# Altium PCB PCB1.PcbDoc (part 2 of 3)
Units mm, origin at the board's own origin, x right, y up, seen from the top; angles counter-clockwise.
Board outline 145 x 122 mm, 4 copper layers (Top Layer, Middle Layer 1, Middle Layer 2, Bottom Layer), stack 1.466 mm thick; 149 components, 242 nets, 995 pads, 740 vias.
Unrouted connection lines stored in the file: 53.
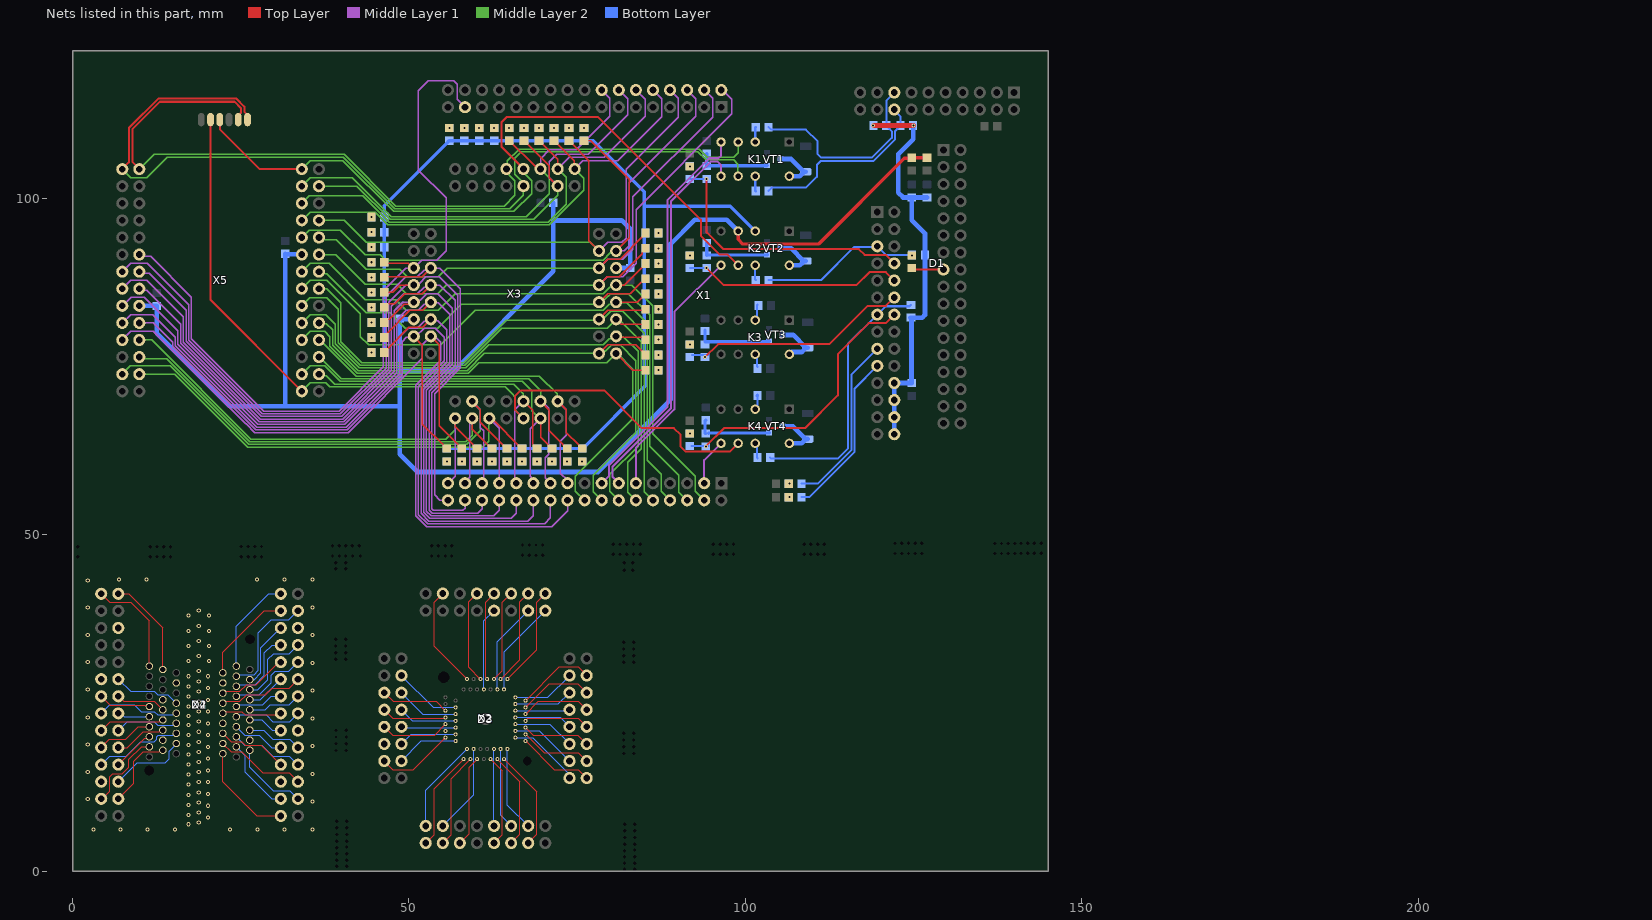
[diagram p4: the nets of this part, all layers, seen from the top]

## Via types
v1: diameter 0.6, hole 0.3, Top Layer to Bottom Layer, tented both sides, 740 vias

## Nets (pads, with @x,y where several pads share a name; then routed paths per layer and width w, separated by ;. In a path a pad name is that pad's centre, name@x,y a point inside that pad or via, vN(x,y) a via of type N, cw(c..) or ccw(c..) an arc to the next point about the centre after c; other vN are vias at no path point) (continued)
IO0_7: IO0_7.2 X1.16 X3.5 X5.12 | length 116
  Top Layer w0.2: IO0_7.2@46.325,90.542 46.492,90.375 49.869,90.375 50.559,89.685 X3.5@50.71,89.685
  Middle Layer 1 w0.2: X5.12@9.92,91.685 10.19,91.415 11.585,91.415 17.659,85.341 17.659,79.144 28.378,68.425 39.65,68.425 46.2,74.975 46.2,86.325 49.536,89.661 50.686,89.661 X3.5@50.71,89.685 51.9,90.875 54.125,90.875 55.525,92.275 55.525,100.1 51.4,104.225 51.4,116.002 52.898,117.5 56.625,117.5 57.16,116.965 57.16,114.765 X1.16@58.33,113.595
IO0_7_KY: D2.12 X4.12 | length 10.1
  Bottom Layer w0.1: X4.12@6.795,28.56 8.605,26.75 12.125,26.75 12.625,26.25 14.16,26.25 D2.12@15.41,25
IO0_7_KY2: D3.5 X2.5 | length 10.2
  Top Layer w0.1: X2.5@46.335,26.56 47.645,25.25 54.045,25.25 D3.5@55.42,23.875
IO1_0: IO1_0.2 X1.33 X3.6 X5.13 | length 122.2
  Top Layer w0.2: IO1_0.2@46.249,87.875 46.249,88.375 51.94,88.375 X3.6@53.25,89.685
  Middle Layer 1 w0.2: X5.13@7.38,89.145 8.61,90.375 11.125,90.375 17.259,84.241 17.259,78.978 28.212,68.025 39.815,68.025 46.6,74.81 46.6,85.475 49.5,88.375 51.25,88.375 52.254,89.379 52.944,89.379 X3.6@53.25,89.685 54.565,89.685 57.65,86.6 57.65,74.862 53.8,71.012 53.8,55.95 54.595,55.155 X1.33@55.79,55.155
IO1_0_KY: D2.13 X4.13 | length 7.8
  Top Layer w0.1: X4.13@4.255,26.02 5.595,24.68 11.23,24.68 D2.13@11.41,24.5
IO1_0_KY2: D3.6 X2.6 | length 9.4
  Bottom Layer w0.1: X2.6@48.875,26.56 52.06,23.375 D3.6@56.945,23.375
IO1_1: IO1_1.2 X1.34 X3.7 X5.14 | length 119.7
  Top Layer w0.2: IO1_1.2@46.176,85.569 46.176,86.069 47.575,86.069 48.651,87.145 X3.7@50.71,87.145
  Middle Layer 1 w0.2: X5.14@9.92,89.145 10.17,88.895 11.355,88.895 16.859,83.391 16.859,78.812 28.047,67.625 39.981,67.625 47,74.644 47,84.625 49.52,87.145 X3.7@50.71,87.145 51.016,87.451 51.576,87.451 52.5,88.375 54.5,88.375 57.25,85.625 57.25,75.027 53.4,71.177 53.4,53.869 53.619,53.65 58,53.65 58.33,53.98 X1.34@58.33,55.155
IO1_1_KY: D2.14 X4.14 | length 7.5
  Top Layer w0.1: X4.14@6.795,26.02 7.565,25.25 12.16,25.25 D2.14@13.41,24
IO1_1_KY2: D3.7 X2.7 | length 9.7
  Top Layer w0.1: X2.7@46.335,24.02 47.605,22.75 55.111,22.75 55.141,22.779 55.324,22.779 D3.7@55.42,22.875
IO1_2: IO1_2.2 X1.35 X3.8 X5.15 | length 126.2
  Top Layer w0.2: IO1_2.2@46.325,83.883 46.825,84.383 47.883,84.383 49.375,85.875 51.98,85.875 X3.8@53.25,87.145
  Middle Layer 1 w0.2: X5.15@7.38,86.605 8.65,87.875 11,87.875 16.459,82.416 16.459,78.647 27.881,67.225 40.147,67.225 47.4,74.478 47.4,84.033 49.242,85.875 51.25,85.875 52.236,86.861 52.966,86.861 X3.8@53.25,87.145 54.605,87.145 56.85,84.9 56.85,75.193 53,71.343 53,53.703 53.453,53.25 60.25,53.25 60.87,53.87 X1.35@60.87,55.155
IO1_2_KY: D2.15 X4.15 | length 12.4
  Bottom Layer w0.1: X4.15@4.255,23.48 5.525,24.75 9.195,24.75 10.195,23.75 12.125,23.75 12.625,23.25 14.889,23.25 15.139,23.5 D2.15@15.41,23.5
IO1_2_KY2: D3.8 X2.8 | length 8.8
  Bottom Layer w0.1: X2.8@48.875,24.02 50.52,22.375 D3.8@56.945,22.375
IO1_3: IO1_3.2 X1.36 X3.9 X5.16 | length 121.4
  Top Layer w0.2: IO1_3.2@46.155,81.097 46.155,81.597 46.656,82.098 47.098,82.098 49.321,84.321 50.426,84.321 X3.9@50.71,84.605
  Middle Layer 1 w0.2: X5.16@9.92,86.605 10.144,86.381 10.994,86.381 16.059,81.316 16.059,78.481 27.715,66.825 40.312,66.825 47.8,74.313 47.8,83.3 49.105,84.605 X3.9@50.71,84.605 51.016,84.911 51.661,84.911 52.625,85.875 54.25,85.875 56.45,83.675 56.45,75.359 52.6,71.509 52.6,53.538 53.288,52.85 62.6,52.85 63.41,53.66 X1.36@63.41,55.155
IO1_3_KY: D2.16 X4.16 | length 4.8
  Bottom Layer w0.1: X4.16@6.795,23.48 7.224,23.48 7.704,23 D2.16@11.41,23
IO1_3_KY2: D3.9 X2.9 | length 10.3
  Top Layer w0.1: X2.9@46.335,21.48 47.565,20.25 53.795,20.25 D3.9@55.42,21.875
IO1_4: IO1_4.2 X1.37 X3.10 X5.17 | length 128.3
  Top Layer w0.2: IO1_4.2@46.144,78.861 IO1_4.2@46.144,79.361 ; IO1_4.2@46.325,79.361 46.825,79.861 46.825,80.075 50.125,83.375 52.02,83.375 X3.10@53.25,84.605
  Middle Layer 1 w0.2: X5.17@7.38,84.065 8.69,85.375 10.625,85.375 15.659,80.341 15.659,78.315 27.55,66.425 40.478,66.425 48.2,74.147 48.2,81.95 49.625,83.375 51.375,83.375 52.299,84.299 52.944,84.299 X3.10@53.25,84.605 53.313,84.542 54.333,84.542 56.05,82.825 56.05,75.524 52.2,71.674 52.2,53.372 53.122,52.45 65.2,52.45 65.95,53.2 X1.37@65.95,55.155
IO1_4_KY: D2.17 X4.17 | length 9.8
  Top Layer w0.1: X4.17@4.255,20.94 5.565,22.25 12.889,22.25 13.139,22.5 D2.17@13.41,22.5
IO1_4_KY2: D3.10 X2.10 | length 8.1
  Bottom Layer w0.1: X2.10@48.875,21.48 48.98,21.375 D3.10@56.945,21.375
IO1_5: IO1_5.2 X1.38 X3.12 X5.19 | length 125.3
  Top Layer w0.2: IO1_5.2@46.134,76.575 46.134,77.125 46.275,77.125 46.825,77.675 46.825,77.7 50,80.875 52.06,80.875 X3.12@53.25,82.065
  Middle Layer 1 w0.2: X5.19@7.38,81.525 8.605,82.75 11.875,82.75 15.259,79.366 15.259,78.15 27.384,66.025 40.644,66.025 48.6,73.981 48.6,79.475 49.875,80.75 51.25,80.75 52.259,81.759 52.944,81.759 X3.12@53.25,82.065 53.494,81.821 54.304,81.821 55.65,80.475 55.65,75.69 51.8,71.84 51.8,53.206 52.956,52.05 67.675,52.05 68.49,52.865 X1.38@68.49,55.155
IO1_5_KY: D2.19 X4.19 | length 8.4
  Top Layer w0.1: X4.19@4.255,18.4 5.48,19.625 7.875,19.625 9.75,21.5 D2.19@11.41,21.5
IO1_5_KY2: D3.12 X2.12 | length 8.7
  Bottom Layer w0.1: X2.12@48.875,18.94 50.31,20.375 D3.12@56.945,20.375
IO1_6: IO1_6.2 X1.39 X3.13 X5.20 | length 131.9
  Top Layer w0.2: X3.13@50.71,79.525 52,78.235 52,66.472 55.075,63.397 55.075,63.347 55.575,62.847 IO1_6.2@55.625,62.847
  Middle Layer 1 w0.2: X5.20@9.92,81.525 11.975,81.525 14.859,78.641 14.859,77.984 27.218,65.625 40.809,65.625 49,73.816 49,78.75 49.627,79.377 50.562,79.377 X3.13@50.71,79.525 51.025,79.525 52.25,80.75 53.875,80.75 55.25,79.375 55.25,75.875 51.4,72.025 51.4,53.041 52.791,51.65 70.15,51.65 71.03,52.53 X1.39@71.03,55.155
IO1_6_KY: D2.20 X4.20 | length 7.7
  Top Layer w0.1: X4.20@6.795,18.4 8.15,18.4 10.5,20.75 12.889,20.75 13.139,21 D2.20@13.41,21
IO1_6_KY2: D3.13 X2.13 | length 11.6
  Top Layer w0.1: X2.13@46.335,16.4 47.61,15.125 50.67,15.125 D3.13@55.42,19.875
IO1_7: IO1_7.2 X1.40 X3.14 X5.21 | length 133.3
  Top Layer w0.2: X3.14@53.25,79.525 54.5,78.275 54.5,66.208 57.311,63.397 57.311,63.347 57.811,62.847 IO1_7.2@57.861,62.847
  Middle Layer 1 w0.2: X5.21@7.38,78.985 8.645,80.25 12,80.25 25.75,66.5 25.777,66.5 27.052,65.225 40.975,65.225 52,76.25 52,78.275 X3.14@53.25,79.525 53.556,79.219 54.156,79.219 54.75,78.625 54.75,76 51,72.25 51,52.875 52.625,51.25 71.25,51.25 73.57,53.57 X1.40@73.57,55.155
IO1_7_KY: D2.21 X4.21 | length 13.3
  Bottom Layer w0.1: X4.21@4.255,15.86 5.52,17.125 8,17.125 10.125,19.25 12.125,19.25 12.5,19.625 12.5,20 12.75,20.25 14.889,20.25 15.139,20.5 D2.21@15.41,20.5
IO1_7_KY2: D3.14 X2.14 | length 9.3
  Bottom Layer w0.1: X2.14@48.875,16.4 51.85,19.375 D3.14@56.945,19.375
IO2_0: IO2_0.2 X1.49 X3.15 X5.22 | length 71.3
  Top Layer w0.2: X3.15@56.86,67.335 56.86,66.084 59.547,63.397 59.547,63.347 60.047,62.847 IO2_0.2@60.097,62.847
  Middle Layer 1 w0.2: X1.49@55.79,57.695 56.86,58.765 X3.15@56.86,67.335
  Middle Layer 2 w0.2: X5.22@9.92,78.985 11.765,78.985 26.5,64.25 55.5,64.25 56.86,65.61 X3.15@56.86,67.335
IO2_0_KY: D2.22 X4.22 | length 6.3
  Top Layer w0.1: X4.22@6.795,15.86 10.744,19.809 11.219,19.809 D2.22@11.41,20
IO2_0_KY2: D3.15 X2.15 | length 14.8
  Top Layer w0.1: X2.15@52.485,4.21 53.75,5.475 53.75,12.295 D3.15@58.125,16.67
IO2_1: IO2_1.2 X1.50 X3.17 X5.24 | length 73.4
  Top Layer w0.2: X3.17@59.4,67.335 59.4,65.73 62.283,62.847 IO2_1.2@62.333,62.847
  Middle Layer 1 w0.2: X1.50@58.33,57.695 58.33,57.886 59,58.556 59,66.502 59.4,66.902 X3.17@59.4,67.335
  Middle Layer 2 w0.2: X5.24@9.92,76.445 10.195,76.17 14.014,76.17 26.334,63.85 58.409,63.85 59.4,64.841 X3.17@59.4,67.335
IO2_1_KY: D2.24 X4.24 | length 11.7
  Bottom Layer w0.1: X4.24@6.795,13.32 9.6,16.125 13.75,16.125 14.375,16.75 14.375,17.875 14.7,18.2 15.41,18.91 D2.24@15.41,19
IO2_1_KY2: D3.17 X2.17 | length 14.2
  Top Layer w0.1: X2.17@55.025,4.21 56.25,5.435 56.25,13.795 D3.17@59.125,16.67
IO2_2: IO2_2.2 X1.51 X3.18 X5.25 | length 86.5
  Top Layer w0.2: X3.18@59.4,69.875 60.625,68.65 60.625,66.741 64.519,62.847 IO2_2.2@64.569,62.847
  Middle Layer 1 w0.2: X3.18@59.4,69.875 60.625,68.65 60.625,65.972 61.125,65.472 61.125,57.95 X1.51@60.87,57.695
  Middle Layer 2 w0.2: X5.25@7.38,73.905 8.6,75.125 14.494,75.125 26.169,63.45 58.575,63.45 60.625,65.5 60.625,68.65 X3.18@59.4,69.875
IO2_2_KY: D2.25 X4.25 | length 12.3
  Top Layer w0.1: X4.25@4.255,10.78 4.405,10.78 5.525,11.9 5.525,14.025 6,14.5 7.375,14.5 8.375,15.5 8.375,16.625 10.25,18.5 D2.25@11.41,18.5
IO2_2_KY2: D3.18 X2.18 | length 13.4
  Bottom Layer w0.1: X2.18@55.025,6.75 59.625,11.35 D3.18@59.625,18.195
IO2_3: IO2_3.2 X1.52 X3.19 X5.26 | length 77.2
  Top Layer w0.2: X3.19@61.94,67.335 62.267,67.335 66.756,62.847 IO2_3.2@66.806,62.847
  Middle Layer 1 w0.2: X3.19@61.94,67.335 63.41,65.865 X1.52@63.41,57.695
  Middle Layer 2 w0.2: X5.26@9.92,73.905 15.148,73.905 26.003,63.05 60.919,63.05 61.826,63.958 61.826,67.221 X3.19@61.94,67.335
IO2_3_KY: D2.26 X4.26 | length 11.5
  Top Layer w0.1: X4.26@6.795,10.78 9.12,13.105 9.12,16.37 10.5,17.75 12.889,17.75 13.139,18 D2.26@13.41,18
IO2_3_KY2: D3.19 X2.19 | length 13.5
  Top Layer w0.1: X2.19@57.565,4.21 58.96,5.605 58.96,15.505 D3.19@60.125,16.67
IO2_4: IO2_4.2 X1.53 X3.24 X5.31 | length 53.4
  Top Layer w0.2: X3.24@67.02,69.875 68.375,68.52 68.375,63.464 68.492,63.347 68.992,62.847 IO2_4.2@69.042,62.847
  Middle Layer 1 w0.2: X1.53@65.95,57.695 65.75,57.895 65.75,68.605 X3.24@67.02,69.875
  Middle Layer 2 w0.2: X5.31@36.62,73.905 36.844,73.681 37.694,73.681 38.95,72.425 65.575,72.425 67.02,70.98 X3.24@67.02,69.875
IO2_4_KY: D2.31 X4.31 | length 11.6
  Bottom Layer w0.1: D2.31@26.34,18 26.34,15.493 29.855,11.978 32.297,11.978 X4.31@33.495,10.78
IO2_4_KY2: D3.24 X2.24 | length 11.5
  Bottom Layer w0.1: D3.24@62.625,18.195 62.625,6.77 X2.24@62.645,6.75
IO2_5: IO2_5.2 X1.54 X3.25 X5.32 | length 56.6
  Top Layer w0.2: X3.25@69.56,67.335 69.56,64.564 70.728,63.397 70.728,63.347 71.228,62.847 IO2_5.2@71.278,62.847
  Middle Layer 1 w0.2: X1.54@68.49,57.695 68.184,58.001 68.184,58.553 68,58.737 68,65.775 X3.25@69.56,67.335
  Middle Layer 2 w0.2: X5.32@34.08,73.905 35.3,75.125 37.5,75.125 39.8,72.825 66.859,72.825 68.25,71.434 68.25,68.5 69.415,67.335 X3.25@69.56,67.335
IO2_5_KY: D2.32 X4.32 | length 11.3
  Bottom Layer w0.1: D2.32@24.34,18.5 25.625,17.215 25.625,14.75 29.595,10.78 X4.32@30.955,10.78
IO2_5_KY2: D3.25 X2.25 | length 14.4
  Top Layer w0.1: D3.25@63.125,16.67 66.5,13.295 66.5,5.525 X2.25@65.185,4.21
IO2_6: IO2_6.2 X1.55 X3.26 X5.33 | length 58.6
  Top Layer w0.2: X3.26@69.56,69.875 70.875,68.56 70.875,65.485 72.964,63.397 72.964,63.347 73.464,62.847 IO2_6.2@73.514,62.847
  Middle Layer 1 w0.2: X3.26@69.56,69.875 69.75,69.875 70.75,68.875 70.75,62 70.25,61.5 70.25,58.475 X1.55@71.03,57.695
  Middle Layer 2 w0.2: X5.33@36.62,76.445 36.746,76.445 39.966,73.225 67.775,73.225 69.56,71.44 X3.26@69.56,69.875
IO2_6_KY: D2.33 X4.33 | length 13.5
  Top Layer w0.1: D2.33@22.34,19 23.59,17.75 25.125,17.75 28.25,14.625 32.19,14.625 X4.33@33.495,13.32
IO2_6_KY2: D3.26 X2.26 | length 12.2
  Bottom Layer w0.1: D3.26@63.625,18.337 63.625,8.31 X2.26@65.185,6.75
IO2_7: IO2_7.2 X1.56 X3.28 X5.35 | length 61.9
  Top Layer w0.2: X3.28@72.1,69.875 73.375,68.6 73.375,65.222 75.2,63.397 75.2,63.347 75.7,62.847 IO2_7.2@75.75,62.847
  Middle Layer 1 w0.2: X3.28@72.1,69.875 73.375,68.6 73.375,64.809 72.5,63.934 72.5,59.198 73.57,58.128 X1.56@73.57,57.695
  Middle Layer 2 w0.2: X5.35@36.62,78.985 36.765,78.985 42.125,73.625 69.375,73.625 72.042,70.958 72.042,69.933 X3.28@72.1,69.875
IO2_7_KY: D2.35 X4.35 | length 10.9
  Bottom Layer w0.1: D2.35@24.34,20 25.59,18.75 28.125,18.75 29.75,17.125 32.23,17.125 X4.35@33.495,15.86
IO2_7_KY2: D3.28 X2.28 | length 12.7
  Bottom Layer w0.1: D3.28@64.625,18.195 64.625,9.85 X2.28@67.725,6.75
IO3_0: IO3_0.2 X1.41 X3.29 X5.36 | length 84.6
  Top Layer w0.2: X3.29@80.79,76.985 83.275,74.5 IO3_0.2@85.416,74.5
  Middle Layer 2 w0.2: X5.36@34.08,78.985 35.345,80.25 37.5,80.25 38.25,79.5 38.25,78.066 42.291,74.025 58.8,74.025 60.4,75.625 79.43,75.625 X3.29@80.79,76.985 80.956,76.985 83.3,74.641 83.3,67.3 74.75,58.75 74.75,56.515 X1.41@76.11,55.155
IO3_0_KY: D2.36 X4.36 | length 10.5
  Top Layer w0.1: D2.36@22.34,20.5 23.59,19.25 25.125,19.25 25.625,18.75 28.065,18.75 X4.36@30.955,15.86
IO3_0_KY2: D3.29 X2.29 | length 11.4
  Top Layer w0.1: D3.29@67.33,19.375 71.58,15.125 75.15,15.125 X2.29@76.415,13.86
IO3_1: IO3_1.2 X1.42 X3.30 X5.37 | length 85.9
  Top Layer w0.2: X3.30@78.25,76.985 79.515,78.25 83.739,78.25 85.175,76.814 IO3_1.2@85.175,76.764
  Middle Layer 2 w0.2: X5.37@36.62,81.525 36.723,81.422 37.703,81.422 38.65,80.475 38.65,78.231 42.456,74.425 58.634,74.425 61.194,76.985 X3.30@78.25,76.985 78.556,77.291 79.166,77.291 80.125,78.25 81.375,78.25 83.7,75.925 83.7,65.2 77.375,58.875 77.375,56.43 X1.42@78.65,55.155
IO3_1_KY: D2.37 X4.37 | length 8.2
  Bottom Layer w0.1: D2.37@26.34,21 28.375,21 29.75,19.625 32.27,19.625 X4.37@33.495,18.4
IO3_1_KY2: D3.30 X2.30 | length 10.9
  Bottom Layer w0.1: D3.30@65.805,19.875 68.375,19.875 73.49,14.76 73.49,14.705 73.875,14.32 X2.30@73.875,13.86
IO3_2: IO3_2.2 X1.43 X3.31 X5.38 | length 87.4
  Top Layer w0.2: X3.31@80.79,79.525 80.94,79.375 84.828,79.375 IO3_2.2@85.175,79.028
  Middle Layer 2 w0.2: X5.38@34.08,81.525 35.305,82.75 37.625,82.75 39.05,81.325 39.05,78.397 42.622,74.825 58.468,74.825 61.893,78.25 78.875,78.25 79.759,79.134 79.966,79.134 80.357,79.525 80.38,79.502 81.873,79.502 84.1,77.275 84.1,63.225 79.875,59 79.875,56.47 X1.43@81.19,55.155
IO3_2_KY: D2.38 X4.38 | length 7.9
  Bottom Layer w0.1: D2.38@24.34,21.5 25.59,20.25 27.75,20.25 29.6,18.4 X4.38@30.955,18.4
IO3_2_KY2: D3.31 X2.31 | length 10.7
  Top Layer w0.1: D3.31@67.33,20.375 70.08,17.625 75.19,17.625 X2.31@76.415,16.4
IO3_3: IO3_3.2 X1.44 X3.33 X5.40 | length 91.8
  Top Layer w0.2: X3.33@80.79,82.065 81.563,81.292 IO3_3.2@85.175,81.292
  Middle Layer 2 w0.2: X5.40@34.08,84.065 35.265,85.25 37.75,85.25 39.45,83.55 39.45,78.563 42.788,75.225 58.303,75.225 63.828,80.75 79.475,80.75 X3.33@80.79,82.065 81.185,82.065 84.5,78.75 84.5,62.829 82.5,60.829 82.5,56.385 X1.44@83.73,55.155
IO3_3_KY: D2.40 X4.40 | length 5.3
  Bottom Layer w0.1: D2.40@26.34,22.5 28.125,22.5 29.685,20.94 X4.40@30.955,20.94
IO3_3_KY2: D3.33 X2.33 | length 10.1
  Top Layer w0.1: D3.33@67.33,21.375 68.455,20.25 75.105,20.25 X2.33@76.415,18.94
IO3_4: IO3_4.2 X1.45 X3.34 X5.41 | length 94
  Top Layer w0.2: X3.34@78.25,82.065 79.56,83.375 84.994,83.375 IO3_4.2@85.393,83.773
  Middle Layer 2 w0.2: X5.41@36.62,86.605 37.77,86.605 39.85,84.525 39.85,78.728 42.953,75.625 58.137,75.625 64.429,81.917 78.102,81.917 78.556,82.371 79.121,82.371 80,83.25 81.75,83.25 85,80 85,56.425 X1.45@86.27,55.155
IO3_4_KY: D2.41 X4.41 | length 10.2
  Bottom Layer w0.1: D2.41@24.34,23 24.611,23 24.861,23.25 28.75,23.25 29.75,22.25 32.265,22.25 X4.41@33.495,23.48
IO3_4_KY2: D3.34 X2.34 | length 9.3
  Bottom Layer w0.1: D3.34@65.805,21.875 70.94,21.875 X2.34@73.875,18.94
IO3_5: IO3_5.2 X1.46 X3.35 X5.42 | length 94.9
  Top Layer w0.2: X3.35@80.79,84.605 83.961,84.605 84.625,85.269 84.675,85.269 85.175,85.769 IO3_5.2@85.175,86.369
  Middle Layer 2 w0.2: X5.42@34.08,86.605 35.35,87.875 37.75,87.875 42.75,82.875 42.75,79.5 44,78.25 54.75,78.25 59.875,83.375 78.875,83.375 79.799,84.299 80.484,84.299 X3.35@80.79,84.605 80.893,84.502 82.373,84.502 85.4,81.475 85.4,61.1 87.5,59 87.5,56.465 X1.46@88.81,55.155
IO3_5_KY: D2.42 X4.42 | length 9
  Top Layer w0.1: D2.42@22.34,23.5 22.611,23.5 22.861,23.75 25.125,23.75 25.625,23.25 30.725,23.25 X4.42@30.955,23.48
IO3_5_KY2: D3.35 X2.35 | length 9.8
  Top Layer w0.1: D3.35@67.308,22.375 67.683,22.75 75.145,22.75 X2.35@76.415,21.48
IO3_6: IO3_6.2 X1.47 X3.36 X5.43 | length 94.3
  Top Layer w0.2: X3.36@78.25,84.605 79.52,85.875 82.875,85.875 84.533,87.533 84.675,87.533 IO3_6.2@85.175,88.033
  Middle Layer 2 w0.2: X5.43@36.62,89.145 36.926,88.839 37.786,88.839 43.625,83 47.2,83 49.45,80.75 54.25,80.75 57.804,84.304 77.949,84.304 X3.36@78.25,84.605 78.683,84.605 79.091,85.014 79.139,85.014 80,85.875 82.625,85.875 85.8,82.7 85.8,63.2 90.125,58.875 90.125,56.38 X1.47@91.35,55.155
IO3_6_KY: D2.43 X4.43 | length 8
  Bottom Layer w0.1: D2.43@26.34,24 28.625,24 29.375,24.75 32.225,24.75 X4.43@33.495,26.02
IO3_6_KY2: D3.36 X2.36 | length 8.9
  Bottom Layer w0.1: D3.36@65.58,22.875 72.48,22.875 X2.36@73.875,21.48
IO3_7: IO3_7.2 X1.48 X3.37 X5.44 | length 96.1
  Top Layer w0.2: X3.37@80.79,87.145 82.02,87.145 84.672,89.797 84.675,89.797 IO3_7.2@85.175,90.297
  Middle Layer 2 w0.2: X5.44@34.08,89.145 35.31,90.375 38.125,90.375 43.5,85 48,85 49.625,83.375 54.375,83.375 56.875,85.875 78.875,85.875 79.839,86.839 80.484,86.839 X3.37@80.79,87.145 83.105,87.145 86.2,84.05 86.2,65.05 92.52,58.73 92.52,56.525 X1.48@93.89,55.155
IO3_7_KY: D2.44 X4.44 | length 7.2
  Bottom Layer w0.1: D2.44@24.34,24.5 24.611,24.5 24.861,24.75 28.25,24.75 29.52,26.02 X4.44@30.955,26.02
IO3_7_KY2: D3.37 X2.37 | length 10.4
  Top Layer w0.1: D3.37@67.33,23.375 69.205,25.25 75.185,25.25 X2.37@76.415,24.02
IO4_0: IO4_0.2 X1.17 X3.38 X5.45 | length 93.2
  Top Layer w0.2: X3.38@78.25,87.145 79.48,88.375 81.25,88.375 84.675,91.8 84.675,92.111 IO4_0.2@85.175,92.611
  Middle Layer 1 w0.2: X3.38@78.25,87.145 79.48,88.375 81.75,88.375 83.75,90.375 83.75,98.375 98,112.625 98,114.788 96.653,116.135 X1.17@96.43,116.135
  Middle Layer 2 w0.2: X5.45@36.62,91.685 36.633,91.672 39.078,91.672 43.5,87.25 48.25,87.25 49.625,85.875 54.25,85.875 55.52,87.145 X3.38@78.25,87.145
IO4_0_KY: D2.45 X4.45 | length 12.6
  Top Layer w0.1: D2.45@22.34,25 22.611,25 22.861,25.25 24.875,25.25 25.875,26.25 28.645,26.25 29.645,27.25 32.185,27.25 X4.45@33.495,28.56
IO4_0_KY2: D3.38 X2.38 | length 8.4
  Bottom Layer w0.1: D3.38@65.58,23.875 73.73,23.875 X2.38@73.875,24.02
IO4_1: IO4_1.2 X1.18 X3.40 X5.47 | length 88.9
  Top Layer w0.2: X3.40@78.25,89.685 79.565,91 81.375,91 84.675,94.3 84.675,94.375 IO4_1.2@85.175,94.875
  Middle Layer 1 w0.2: X3.40@78.25,89.685 79.565,91 81.75,91 83.25,92.5 83.25,100.25 95.125,112.125 95.125,114.9 X1.18@93.89,116.135
  Middle Layer 2 w0.2: X5.47@36.62,94.225 36.926,93.919 39.206,93.919 43.625,89.5 48.625,89.5 49.75,88.375 54.375,88.375 55.685,89.685 X3.40@78.25,89.685
IO4_1_KY: D2.47 X4.47 | length 11.9
  Bottom Layer w0.1: D2.47@24.34,26 24.611,26 24.861,26.25 27.75,26.25 29.5,28 29.5,29.125 30.125,29.75 32.145,29.75 X4.47@33.495,31.1
IO4_1_KY2: D3.40 X2.40 | length 8.8
  Bottom Layer w0.1: D3.40@65.808,24.875 72.19,24.875 X2.40@73.875,26.56
IO4_2: IO4_2.2 X1.19 X3.41 X5.48 | length 100.2
  Top Layer w0.2: IO4_2.2@76,108.6 77.025,108.6 82.75,102.875 82.75,94.185 X3.41@80.79,92.225
  Middle Layer 1 w0.2: X3.41@80.79,92.225 81.975,92.225 82.75,93 82.75,102.375 92.625,112.25 92.625,114.86 X1.19@91.35,116.135
  Middle Layer 2 w0.2: X5.48@34.08,94.225 35.18,95.325 39.8,95.325 43.5,91.625 45.75,91.625 46.5,90.875 78.875,90.875 79.919,91.919 80.484,91.919 X3.41@80.79,92.225
IO4_2_KY: D2.48 X4.48 | length 10.5
  Top Layer w0.1: D2.48@22.34,26.5 22.611,26.5 22.861,26.75 24.875,26.75 25.875,27.75 27.282,27.75 30.632,31.1 X4.48@30.955,31.1
IO4_2_KY2: D3.41 X2.41 | length 11.7
  Top Layer w0.1: D3.41@67.33,25.375 72.33,30.375 75.14,30.375 X2.41@76.415,29.1
IO4_3: IO4_3.2 X1.20 X3.42 X5.49 | length 92.3
  Top Layer w0.2: IO4_3.2@73.778,108.6 73.828,108.6 74.328,108.1 74.328,108.05 76.75,105.628 76.75,93.725 X3.42@78.25,92.225
  Middle Layer 1 w0.2: X3.42@78.25,92.225 79.525,93.5 81.641,93.5 82.275,94.134 82.275,104.4 90,112.125 90,114.945 X1.20@88.81,116.135
  Middle Layer 2 w0.2: X5.49@36.62,96.765 40.36,96.765 43.625,93.5 76.975,93.5 X3.42@78.25,92.225
IO4_3_KY: D2.49 X4.49 | length 11.7
  Bottom Layer w0.1: D2.49@26.34,27 27.5,27 29,28.5 29,31.5 29.875,32.375 32.23,32.375 X4.49@33.495,33.64
IO4_3_KY2: D3.42 X2.42 | length 9.5
  Bottom Layer w0.1: D3.42@65.685,25.875 70.65,25.875 X2.42@73.875,29.1
IO4_4: IO4_4.2 X1.21 X3.43 X5.50 | length 75.2
  Top Layer w0.2: IO4_4.2@71.556,108.6 71.606,108.6 72.106,108.1 72.106,108.05 74.541,105.615 74.541,104.514 X3.43@74.64,104.415
  Middle Layer 1 w0.2: X3.43@74.64,104.415 75.85,105.625 81,105.625 87.557,112.182 87.557,114.848 X1.21@86.27,116.135
  Middle Layer 2 w0.2: X5.50@34.08,96.765 35.315,98 44.975,98 46.875,96.1 70.85,96.1 76,101.25 76,103.055 X3.43@74.64,104.415
IO4_4_KY: D2.50 X4.50 | length 11.1
  Bottom Layer w0.1: D2.50@24.34,27.5 24.611,27.5 24.861,27.75 27.125,27.75 28.5,29.125 28.5,32.5 29.64,33.64 X4.50@30.955,33.64
IO4_4_KY2: D3.43 X2.43 | length 15
  Top Layer w0.1: D3.43@64.625,28.58 69,32.955 69,40.025 X2.43@70.265,41.29
IO4_5: IO4_5.2 X1.22 X3.45 X5.52 | length 74.3
  Top Layer w0.2: IO4_5.2@69.333,108.6 69.383,108.6 69.883,108.1 69.883,108.05 72.1,105.833 X3.45@72.1,104.415
  Middle Layer 1 w0.2: X3.45@72.1,104.415 73.81,106.125 79,106.125 85.125,112.25 85.125,114.74 X1.22@83.73,116.135
  Middle Layer 2 w0.2: X5.52@34.08,99.305 35.18,100.405 43.135,100.405 47.04,96.5 70.684,96.5 73.375,99.191 73.375,103.14 X3.45@72.1,104.415
IO4_5_KY: D2.52 X4.52 | length 10
  Bottom Layer w0.1: D2.52@26.34,28.5 27,28.5 28,29.5 28,33.225 X4.52@30.955,36.18
IO4_5_KY2: D3.45 X2.45 | length 14.4
  Top Layer w0.1: D3.45@63.625,28.58 66.5,31.455 66.5,40.065 X2.45@67.725,41.29
IO4_6: IO4_6.2 X1.23 X3.46 X5.53 | length 72.1
  Top Layer w0.2: IO4_6.2@67.111,108.6 67.161,108.6 70.875,104.886 70.875,103.1 X3.46@72.1,101.875
  Middle Layer 1 w0.2: X3.46@72.1,101.875 70.883,103.092 70.883,105.508 72,106.625 76.625,106.625 82.5,112.5 82.5,114.825 X1.23@81.19,116.135
  Middle Layer 2 w0.2: X5.53@36.62,101.845 42.261,101.845 47.206,96.9 68.525,96.9 72.1,100.475 X3.46@72.1,101.875
IO4_6_KY: D2.53 X4.53 | length 16.5
  Bottom Layer w0.1: D2.53@24.34,29 24.611,29 24.861,29.25 27,29.25 27.625,29.875 27.625,35.5 29.5,37.375 32.15,37.375 X4.53@33.495,38.72
IO4_6_KY2: D3.46 X2.46 | length 13.6
  Bottom Layer w0.1: D3.46@63.125,27.055 63.125,34.15 X2.46@67.725,38.75
IO4_7: IO4_7.2 X1.24 X3.47 X5.54 | length 70.6
  Top Layer w0.2: IO4_7.2@64.889,108.6 64.939,108.6 68.818,104.721 69.254,104.721 X3.47@69.56,104.415
  Middle Layer 1 w0.2: X3.47@69.56,104.415 69.56,105.935 70.875,107.25 74.875,107.25 79.875,112.25 79.875,114.91 X1.24@78.65,116.135
  Middle Layer 2 w0.2: X5.54@34.08,101.845 35.36,103.125 41.547,103.125 47.372,97.3 67.425,97.3 70.875,100.75 70.875,103.1 X3.47@69.56,104.415
IO4_7_KY: D2.54 X4.54 | length 14.2
  Top Layer w0.1: D2.54@22.34,29.5 22.34,32.59 28.47,38.72 X4.54@30.955,38.72
IO4_7_KY2: D3.47 X2.47 | length 13.8
  Top Layer w0.1: D3.47@62.625,28.58 63.875,29.83 63.875,39.98 X2.47@65.185,41.29
LED_READ: D1.17X3 R41.1 | length 26.1
  Bottom Layer w0.3: R41.1@108.32,57.625 110.75,57.625 115.75,62.625 115.75,73.815 D1.17X3@119.61,77.675
LED_WRITE: D1.19X3 R42.1 | length 24.9
  Bottom Layer w0.3: R42.1@108.32,55.625 109.5,55.625 116.25,62.375 116.25,71.775 D1.19X3@119.61,75.135
NetK1_3: K1.3 R1.1 | length 2.2
  Bottom Layer w0.381: K1.3@101.47,108.415 101.47,110.545 R1.1@101.55,110.625
NetK1_10: K1.10 R3.1 | length 2.2
  Bottom Layer w0.381: K1.10@101.47,103.335 101.47,101.205 R3.1@101.55,101.125
NetK1_12: K1.12 VD1.1 VT1.3 | length 7.3
  Bottom Layer w0.7: VT1.3@105.25,105.875 106.8,105.875 VD1.1@108.7,103.975 ; K1.12@106.55,103.335 108.09,103.335 108.5,103.745 108.5,103.775 VD1.1@108.7,103.975 ; VD1.1@108.7,103.975 VD1.1@109,103.975 VD1.1@108.7,103.975
NetK2_10: K2.10 R56.1 | length 2.2
  Bottom Layer w0.3: K2.10@101.47,90.085 101.47,87.955 R56.1@101.55,87.875
NetK2_12: K2.12 VD2.1 VT2.3 | length 7.3
  Bottom Layer w0.7: VT2.3@105.25,92.625 106.8,92.625 VD2.1@108.7,90.725 ; K2.12@106.55,90.085 108.09,90.085 108.5,90.495 108.5,90.525 VD2.1@108.7,90.725 ; VD2.1@108.7,90.725 VD2.1@109,90.725 VD2.1@108.7,90.725
NetK3_3: K3.3 R54.1 | length 2
  Bottom Layer w0.3: K3.3@101.763,82.273 101.763,84.153 R54.1@101.843,84.233
NetK3_10: K3.10 R58.1 | length 2.2
  Bottom Layer w0.3: K3.10@101.763,77.193 101.763,75.063 R58.1@101.843,74.983
NetK3_12: K3.12 VD39.1 VT3.3 | length 7.3
  Bottom Layer w0.7: VT3.3@105.543,79.733 107.093,79.733 VD39.1@108.993,77.833 ; K3.12@106.843,77.193 108.383,77.193 108.793,77.603 108.793,77.633 VD39.1@108.993,77.833 ; VD39.1@108.993,77.833 VD39.1@109.293,77.833 VD39.1@108.993,77.833
NetK4_3: K4.3 R55.1 | length 2
  Bottom Layer w0.3: K4.3@101.79,68.737 R55.1@101.79,70.617
  Bottom Layer w0.5: K4.3@101.75,68.697 K4.3@101.79,68.737 ; R55.1@101.76,70.71 R55.1@101.8,70.75
NetK4_10: K4.10 R59.1 | length 2.2
  Bottom Layer w0.3: K4.10@101.75,63.617 101.75,61.487 R59.1@101.83,61.407
NetK4_12: K4.12 VD40.1 VT4.3 | length 7.3
  Bottom Layer w0.7: VT4.3@105.53,66.157 107.08,66.157 VD40.1@108.98,64.257 ; K4.12@106.83,63.617 108.37,63.617 108.78,64.027 108.78,64.057 VD40.1@108.98,64.257 ; VD40.1@108.98,64.257 VD40.1@109.28,64.257 VD40.1@108.98,64.257
NetR5_2: R5.2 R7.1 VT1.1 | length 10.9
  Bottom Layer w0.5: R7.1@94.25,106.675 R5.2@94.25,104.825 94.3,104.875 103.2,104.875 VT1.1@103.25,104.925
NetR6_2: R6.2 R8.1 VT2.1 | length 10.9
  Bottom Layer w0.5: R8.1@94.25,93.425 R6.2@94.25,91.575 94.3,91.625 103.2,91.625 VT2.1@103.25,91.675
NetR9_2: IO1_0.1 R9.2
  other v1: 44.425,88.306
NetR10_2: IO2_0.1 R10.2
  other v1: 60.097,60.947
NetR11_2: IO3_0.1 R11.2
  other v1: 87.075,74.5
NetR12_2: IO4_0.1 R12.2
  other v1: 87.075,92.611
NetR13_2: IO1_1.1 R13.2
  other v1: 44.425,86.069
NetR14_2: IO2_1.1 R14.2
  other v1: 62.333,60.947
NetR15_2: IO3_1.1 R15.2
  other v1: 87.075,76.764
NetR16_2: IO4_1.1 R16.2
  other v1: 87.075,94.875
NetR17_2: IO1_2.1 R17.2
  other v1: 44.425,83.833
NetR18_2: IO2_2.1 R18.2
  other v1: 64.569,60.947
NetR19_2: IO3_2.1 R19.2
  other v1: 87.075,79.028
NetR20_2: IO4_2.1 R20.2
  other v1: 76,110.5
NetR21_2: IO1_3.1 R21.2
  other v1: 44.425,81.597
NetR22_2: IO2_3.1 R22.2
  other v1: 66.806,60.947
NetR23_2: IO3_3.1 R23.2
  other v1: 87.075,81.292
NetR24_2: IO4_3.1 R24.2
  other v1: 73.778,110.5
NetR25_2: IO1_4.1 R25.2
  other v1: 44.425,79.361
NetR26_2: IO2_4.1 R26.2
  other v1: 69.042,60.947
NetR27_2: IO3_4.1 R27.2
  other v1: 87.075,83.556
NetR28_2: IO4_4.1 R28.2
  other v1: 71.556,110.5
NetR29_2: IO1_5.1 R29.2
  other v1: 44.425,77.125
NetR30_2: IO2_5.1 R30.2
  other v1: 71.278,60.947
NetR31_2: IO3_5.1 R31.2
  other v1: 87.075,85.819
NetR32_2: IO4_5.1 R32.2
  other v1: 69.333,110.5
NetR33_2: IO2_6.1 R33.2
  other v1: 73.514,60.947
NetR34_2: IO4_6.1 R34.2
  other v1: 67.111,110.5
NetR35_2: IO1_6.1 R35.2
  other v1: 55.625,60.947
NetR36_2: IO3_6.1 R36.2
  other v1: 87.075,88.083
NetR37_2: IO2_7.1 R37.2
  other v1: 75.75,60.947
NetR38_2: IO4_7.1 R38.2
  other v1: 64.889,110.5
NetR39_2: IO1_7.1 R39.2
  other v1: 57.861,60.947
NetR40_2: IO3_7.1 R40.2
  other v1: 87.075,90.347
NetR41_2: R41.2 READ.1
  other v1: 106.57,57.625
NetR42_2: R42.2 WRITE.1
  other v1: 106.57,55.625
NetR43_2: R43.2 RELE1.1
  other v1: 91.75,104.795
NetR44_2: R44.2 RELE2.1
  other v1: 91.75,91.545
NetR60_2: R60.2 R62.1 VT3.1 | length 11.3
  Bottom Layer w0.5: R62.1@94,80.434 94,78.733 103.493,78.733 VT3.1@103.543,78.783
NetR61_2: R61.2 R63.1 VT4.1 | length 11.1
  Bottom Layer w0.5: R61.2@94.125,65.075 94,65.2 94,66.925 R63.1@94.125,67.05 ; R61.2@94.53,65.107 94.58,65.157 103.48,65.157 VT4.1@103.53,65.207
NetR65_2: R65.2 RELE3.1
  other v1: 91.75,78.317
NetR66_2: R66.2 RELE4.1
  other v1: 91.75,65.077
NetR75_2: IO0_0.1 R75.2
  other v1: 62.667,110.5
NetR76_2: IO0_1.1 R76.2
  other v1: 60.444,110.5
NetR77_2: IO0_2.1 R77.2
  other v1: 58.222,110.5
NetR78_2: IO0_3.1 R78.2
  other v1: 56,110.5
NetR79_2: IO0_4.1 R79.2
  other v1: 44.425,97.25
NetR80_2: IO0_5.1 R80.2
  other v1: 44.425,95.014
NetR81_2: IO0_6.1 R81.2
  other v1: 44.425,92.778
NetR82_2: IO0_7.1 R82.2
  other v1: 44.425,90.542
OE: K4.9 OE.1 X3.23 X5.30 | length 125.5
  Top Layer w0.3: OE.1@20.5,111.75 20.5,84.945 X5.30@34.08,71.365 ; X3.23@67.02,67.335 65.75,68.605 65.75,70.625 66.625,71.5 79,71.5 84.625,65.875 89.375,65.875 90.375,64.875 90.375,63.125 91.125,62.375 97.688,62.375 K4.9@98.93,63.617
  Middle Layer 2 w0.2: X5.30@34.08,71.365 35.34,72.625 37.625,72.625 38.225,72.025 64.304,72.025 65.329,71 65.75,70.579 65.75,68.605 X3.23@67.02,67.335
OE_F: K4.8 X1.64 | length 7
  Middle Layer 1 w0.3: X1.64@93.89,57.695 93.89,61.117 K4.8@96.39,63.617
OE_KY: D2.30 X4.30 | length 14.9
  Top Layer w0.1: D2.30@22.34,17.5 22.34,13.285 27.385,8.24 X4.30@30.955,8.24
OE_KY2: D3.23 X2.23 | length 13.7
  Top Layer w0.1: D3.23@62.125,16.67 63.875,14.92 63.875,5.44 X2.23@62.645,4.21
OE_MC: D1.13X3 R59.2 R64.1 | length 39.5
  Bottom Layer w0.3: R59.2@103.7,61.5 103.825,61.375 113.793,61.375 115.25,62.832 115.25,78.395 D1.13X3@119.61,82.755 120.855,84 124.425,84 R64.1@124.625,84.2
RELE1: D1.8X3 R5.1 R43.1 | length 40.2
  Top Layer w0.3: v1(94.25,102.925) 94.25,95 96.75,92.5 116.875,92.5 117.75,91.625 120.9,91.625 D1.8X3@122.15,90.375
  Bottom Layer w0.3: R43.1@91.75,102.925 v1(94.25,102.925)
RELE2: D1.10X3 R6.1 R44.1 | length 32.8
  Top Layer w0.3: v1(94.25,89.675) 96.8,87.125 116.5,87.125 118.46,89.085 120.9,89.085 D1.10X3@122.15,87.835
  Bottom Layer w0.3: R44.1@91.75,89.675 v1(94.25,89.675)
RELE3: D1.12X3 R60.1 R65.1 | length 34.5
  Top Layer w0.3: v1@93.902,76.327 95.95,78.375 112.5,78.375 118.17,84.045 120.9,84.045 D1.12X3@122.15,85.295
  Bottom Layer w0.3: R65.1@92.043,76.783 R60.1@94.543,76.783
  other v1: 94,76.425
RELE4: D1.14X3 R61.1 R66.1 | length 42.2
  Top Layer w0.3: v1(94.125,63.175) 96.857,65.907 108.907,65.907 113.75,70.75 113.75,76.895 118.34,81.485 120.88,81.485 D1.14X3@122.15,82.755
  Bottom Layer w0.3: R66.1@92.03,63.207 R61.1@94.53,63.207
RESET: K2.9 RESET.1 X3.49 X5.56 | length 113.5
  Top Layer w0.3: RESET.1@21.875,111.75 21.884,111.741 21.884,110.3 27.799,104.385 X5.56@34.08,104.385 ; X3.49@67.02,104.415 63.75,107.685 63.75,111.375 64.5,112.125 78.125,112.125 93.375,96.875 93.375,94.5 96.15,91.725 97.301,91.725 K2.9@98.93,90.096
  Middle Layer 2 w0.2: X5.56@34.08,104.385 35.32,105.625 40.178,105.625 47.703,98.1 65.6,98.1 68.25,100.75 68.25,102.625 67.326,103.549 67.326,104.109 X3.49@67.02,104.415
RESET_F: K2.8 X1.60 | length 37.6
  Middle Layer 1 w0.3: X1.60@83.73,57.695 83.73,62.941 89.45,68.661 89.45,83.156 K2.8@96.39,90.096
RESET_MC: D1.5X3 R49.1 R56.2 R57.1 | length 23.9
  Bottom Layer w0.3: R56.2@103.45,87.875 111.25,87.875 116.205,92.83 D1.5X3@119.565,92.83 ; D1.5X3@119.61,92.915 120.9,91.625 R57.1@124.8,91.625
  other v1: 124.75,91.575
RESET_PCA_KY: D2.56 X4.56 | length 14.6
  Bottom Layer w0.1: D2.56@24.34,30.5 24.34,36.465 29.135,41.26 X4.56@30.955,41.26
RESET_PCA_KY2: D3.49 X2.49 | length 13.3
  Top Layer w0.1: D3.49@61.625,28.58 61.625,28.634 61.375,28.884 61.375,40.02 X2.49@62.645,41.29
RST_IN: R49.2 X1.OUT3 | length 4.8
  Top Layer w0.3: R49.2@124.75,89.675 124.97,89.455 X1.OUT3@129.45,89.455
SCL_F: K1.5 X1.58 | length 58.9
  Middle Layer 1 w0.3: X1.58@78.65,57.695 79.75,58.795 79.75,60.375 88.45,69.075 88.45,99.825 94.625,106 96,106 96.39,106.39 K1.5@96.39,108.415
SCL_MC: D1.15X2 R1.2 R2.1 | length 30
  Bottom Layer w0.3: R1.2@103.45,110.625 103.825,110.25 109,110.25 110.75,108.5 110.75,106.61 111.235,106.125 118.859,106.125 121.775,109.041 121.775,110 R2.1@120.95,110.825 ; R2.1@120.95,110.875 120.95,114.575 D1.15X2@122.15,115.775
SCL_PCA: K1.4 SCL.1 X3.51 X5.2 | length 130.2
  Top Layer w0.3: X5.2@9.92,104.385 9.92,104.404 8.875,105.449 8.875,110.293 12.982,114.4 24.084,114.4 25.025,113.459 25.025,112.776 24.625,112.376 SCL.1@24.625,111.75
  Middle Layer 2 w0.2: X5.2@9.92,104.385 12.11,106.575 40.359,106.575 48.034,98.9 64.175,98.9 65.75,100.475 65.75,102.625 64.869,103.506 64.869,103.594 64.48,103.982 64.623,104.125 64.623,105.623 66.375,107.375 93.125,107.375 94.35,106.15 98.275,106.15 98.93,106.805 K1.4@98.93,108.415
SCL_PCA_KY: D2.2 X4.2 | length 14.9
  Top Layer w0.1: X4.2@6.795,41.26 8.365,41.26 13.41,36.215 D2.2@13.41,30
SCL_PCA_KY2: D3.51 X2.51 | length 13.9
  Top Layer w0.1: X2.51@60.105,41.29 58.875,40.06 58.875,30.33 D3.51@60.625,28.58
SDA_F: K1.8 X1.59 | length 57.7
  Middle Layer 1 w0.3: X1.59@81.19,57.695 81.19,57.724 80.25,58.664 80.25,60.168 88.95,68.868 88.95,99.618 94.832,105.5 95.875,105.5 96.39,104.985 K1.8@96.39,103.335
SDA_MC: D1.16X2 R3.2 R4.1 | length 28.2
  Bottom Layer w0.3: R3.2@103.45,101.125 103.45,101.175 103.9,101.625 109,101.625 110.625,103.25 110.625,105 111.25,105.625 119.066,105.625 122.275,108.834 122.275,110.05 123.05,110.825 123.05,112.226 122.15,113.126 D1.16X2@122.15,113.235
SDA_PCA: K1.9 SDA.1 X3.50 X5.1 | length 135.7
  Top Layer w0.3: X5.1@7.38,104.385 8.375,105.38 8.375,110.5 12.775,114.9 24.291,114.9 25.525,113.666 25.525,112.901 26,112.426 SDA.1@26,111.75
  Middle Layer 2 w0.2: X5.1@7.38,104.385 8.64,103.125 11,103.125 14.05,106.175 40.194,106.175 47.869,98.5 65,98.5 67.02,100.52 X3.50@67.02,101.875 67.02,102.308 66.611,102.716 66.611,102.764 65.75,103.625 65.75,106 66.725,106.975 92.959,106.975 94.184,105.75 98.25,105.75 98.871,105.129 98.871,103.394 K1.9@98.93,103.335
SDA_PCA_KY: D2.1 X4.1 | length 15.5
  Top Layer w0.1: X4.1@4.255,41.26 5.545,39.97 8.655,39.97 11.41,37.215 D2.1@11.41,30.5
SDA_PCA_KY2: D3.50 X2.50 | length 12.2
  Bottom Layer w0.1: D3.50@61.125,27.213 61.125,37.23 X2.50@62.645,38.75
VCC_MC: C1.1 C2.1 D1.22X3 D1.24X3 D1.26X3 D1.28X3 R2.2 R4.2 R52.2 R57.2 R64.2 | length 62.1
  Top Layer w0.7: v1(119,110.875) v1(125,110.875)
  Bottom Layer w0.7: D1.28X3@122.15,64.975 D1.26X3@122.15,67.515 D1.24X3@122.15,70.055 D1.22X3@122.15,72.595 C2.1@124.73,72.595 ; C2.1@124.75,72.575 C2.1@124.73,72.595 ; R4.2@124.95,110.875 124.95,108.825 122.75,106.625 122.75,100.875 123.45,100.175 C1.1@124.75,100.175 ; R52.2@127,100.175 C1.1@124.75,100.175 ; C2.1@124.73,72.595 124.688,72.637 124.688,82.128 124.515,82.3 R64.2@124.625,82.3 126.29,82.3 126.7,82.71 R57.2@126.7,91.625 126.7,94.825 124.75,96.775 C1.1@124.75,100.175
VDD: K2.3 R9.1 R10.1 R11.1 R12.1 R13.1 R14.1 R15.1 R16.1 R17.1 R18.1 R19.1 R20.1 R21.1 R22.1 R23.1 R24.1 R25.1 R26.1 R27.1 R28.1 R29.1 R30.1 R31.1 R32.1 R33.1 R34.1 R35.1 R36.1 R37.1 R38.1 R39.1 R40.1 R75.1 R76.1 R77.1 R78.1 R79.1 R80.1 R81.1 R82.1 | length 148
  Bottom Layer w0.5: R29.1@46.325,77.125 R25.1@46.325,79.361 R21.1@46.325,81.597 R17.1@46.325,83.833 R13.1@46.325,86.069 R9.1@46.325,88.306 R82.1@46.325,90.542 R81.1@46.325,92.778 R80.1@46.325,95.014 R79.1@46.325,97.25 46.325,98.925 55.6,108.2 55.6,108.25 55.95,108.6 R78.1@56,108.6 R77.1@58.222,108.6 R76.1@60.444,108.6 R75.1@62.667,108.6 R38.1@64.889,108.6 R34.1@67.111,108.6 R32.1@69.333,108.6 R28.1@71.556,108.6 R24.1@73.778,108.6 R20.1@76,108.6 77.4,108.6 85,101 85,98.875 ; R35.1@55.625,62.847 R39.1@57.861,62.847 R10.1@60.097,62.847 R14.1@62.333,62.847 R18.1@64.569,62.847 R22.1@66.806,62.847 R26.1@69.042,62.847 R30.1@71.278,62.847 R33.1@73.514,62.847 R37.1@75.75,62.847 75.8,62.847 85.175,72.222 R11.1@85.175,74.5 85,74.675 85,79.028 85,81.292 85,88.083 85,90.347 85,93.861 85,98.875 ; K2.3@101.47,95.165 97.76,98.875 85,98.875
VDD_PCA: C3.1 C4.1 C5.1 C6.1 C7.1 K2.4 R51.2 R53.2 X3.11 X3.39 X5.18 X5.46 | length 269.8
  Top Layer w0.5: K2.4@98.93,95.165 98.93,93.945 99.625,93.25 110.875,93.25 123.643,106.018 124.693,106.018 C3.1@124.75,106.075 R53.2@127,106.075
  Bottom Layer w0.7: X5.18@9.92,84.065 9.927,84.058 12.492,84.058 C7.1@12.5,84.05 12.5,80 23.375,69.125 31.625,69.125 ; X5.46@34.08,91.685 34.022,91.743 31.682,91.743 C5.1@31.625,91.8 31.625,69.125 ; C6.1@48.625,82.175 C6.1@48.625,82.065 ; X3.11@50.71,82.065 C6.1@48.625,82.065 ; R51.2@71.45,99.375 71.45,96.75 ; X3.39@80.79,89.685 80.79,89.7 C4.1@82.875,89.7 82.875,95.5 81.625,96.75 71.45,96.75 ; K2.4@98.93,95.165 97.22,96.875 92.5,96.875 88.875,93.25 88.875,70.125 78.125,59.375 51.25,59.375 48.625,62 48.625,69.125 ; 31.625,69.125 48.625,69.125 ; 48.625,69.125 48.625,74.375 ; 48.625,74.375 56.625,74.375 71.45,89.2 71.45,96.75 ; 48.625,74.375 C6.1@48.625,82.065
VDD_PCA_KY: D2.18 D2.46 X4.18 X4.46 | length 15.4
  Bottom Layer w0.1: X4.18@6.795,20.94 8.105,22.25 12.125,22.25 12.625,21.75 14.889,21.75 15.139,22 D2.18@15.41,22 ; D2.46@26.34,25.5 27.895,25.5 X4.46@30.955,28.56
VDD_PCA_KY2: D3.11 D3.39 X2.11 X2.39 | length 11.1
  Top Layer w0.1: D3.39@67.33,24.375 70.83,27.875 75.1,27.875 X2.39@76.415,26.56
VSS_PCA_KY: D2.6 D2.11 D2.23 D2.34 D2.39 D2.51 X4.6 X4.11 X4.23 X4.34 X4.39 X4.51
  other v1: 3.125,6.25 7.125,6.25 11.125,6.25 15.25,6.25 23.375,6.25 27.5,6.25 31.5,6.25 35.625,6.25 17.25,7 18.75,7.25 20.125,8 17.25,8.375 18.75,8.75 20.125,9.75 17.25,9.875 18.75,10.25 35.625,10.375 2.25,10.75 17.25,11.375 20.125,11.5 18.75,11.75 17.25,12.875 18.75,13.25 20.125,13.25 17.25,14.375 35.625,14.5 2.25,14.75 18.75,14.75 20.125,15 17.25,15.875 18.75,16.25 20.125,16.75 17.25,17.375 18.75,17.75 20.125,18.5 35.625,18.625 17.25,18.75 2.25,18.875 18.75,19.25 17.25,20.25 20.125,20.25 18.75,20.75 17.25,21.75 20.125,22 18.75,22.25 35.625,22.75 2.25,22.875 17.25,23.125 18.75,23.75 20.125,23.75 17.25,24.5 18.75,25.25 20.125,25.5 17.25,26 18.75,26.75 35.625,26.875 2.25,27 20.125,27.25 17.25,27.5 18.75,28.25 17.25,29 20.125,29 18.75,29.75 35.625,31 2.25,31.125 17.25,31.25 20.25,31.25 18.75,32 17.25,33.5 20.25,33.5 18.75,34.25 2.25,35.125 35.625,35.125 17.25,35.75 20.25,35.75 18.75,36.5 17.25,38 20.25,38 18.75,38.75 2.25,39.25 35.625,39.25 2.25,43.25 6.875,43.375 11,43.375 27.375,43.375 31.5,43.375 35.625,43.375
VSS_PCA_KY2: D3.4 D3.16 D3.27 D3.32 D3.44 D3.55 X2.4 X2.16 X2.27 X2.32 X2.44 X2.55 | length 78.4
  Top Layer w0.1: X2.55@55.025,41.29 53.75,40.015 53.75,33.455 D3.55@58.625,28.58 ; D3.27@64.125,16.67 69,11.795 69,5.485 X2.27@67.725,4.21
  Bottom Layer w0.1: X2.4@48.875,29.1 53.6,24.375 D3.4@56.945,24.375 ; X2.16@52.485,6.75 52.485,12.055 D3.16@58.625,18.195 ; D3.44@64.125,27.19 64.125,32.61 X2.44@70.265,38.75 ; D3.32@65.678,20.875 69.4,20.875 X2.32@73.875,16.4
pads on no net: D1.1X3 D1.2X3 D1.3X3 D1.4X3 D1.6X2 D1.6X3 D1.8X2 D1.9X2 D1.10X2 D1.11X2 D1.12X2 D1.13X2 D1.14X2 D1.15X3 D1.16X3 D1.17X2 D1.18X2 D1.18X3 D1.19X2 D1.20X2 D1.20X3 D2.0 D3.0 K2.5 X1.1 X1.2 X1.3 X1.4 X1.5 X1.6 X1.7 X1.8 X1.25 X1.26 X1.27 X1.28 X1.29 X1.30 X1.31 X1.32 X1.57 X1.+12V X1.-12V X1.IN-OUT2 X1.IN-OUT3 X1.IN-OUT4 X1.IN-OUT5 X1.IN-OUT6 X1.IN-OUT7 X1.IN-OUT8 X1.NC X1.OUT4 X1.OUT5 X1.OUT6 X1.OUT7 X1.OUT8 X1.VDDF X1.VDDS X1.VEEF X1.VEES

## Polygon pours and split planes (outlines as drawn)
GND on Middle Layer 1 "NONET_L-01_P-001" (solid, remove dead copper, pour order 0): 144,121 144,50.625 1,50.625 1,121
VSS_PCA_KY2 on Middle Layer 1 "NONET_L-01_P-001" (solid, remove dead copper, pour order 2): 43.125,44.5 43.125,1 79.625,1 79.625,44.5
VSS_PCA_KY on Middle Layer 1 "NONET_L-01_P-001" (solid, remove dead copper, pour order 1): 1,44.5 1,4.75 36.875,4.75 36.875,44.5
GND on Middle Layer 2 "NONET_L-01_P-001" (solid, remove dead copper, pour order 12): 1,121 1,50.625 144,50.625 144,121
VDD_PCA_KY2 on Middle Layer 2 "NONET_L-01_P-001" (solid, remove dead copper, pour order 7): 43.125,44.5 43.125,1 79.625,1 79.625,44.5
VDD_PCA_KY on Middle Layer 2 "NONET_L-01_P-001" (solid, remove dead copper, pour order 3): 1.375,44.25 1.375,5.25 36.375,5.25 36.375,44.25
GND on Top Layer "NONET_L-01_P-001" (solid, remove dead copper, pour order 11): 1,121 1,50.625 144,50.625 144,121
GND_KY2 on Top Layer "NONET_L-01_P-001" (solid, remove dead copper, pour order 6): 43.125,44.5 43.125,1 79.625,1 79.625,44.5
VSS_PCA_KY on Top Layer "NONET_L-01_P-001" (solid, remove dead copper, pour order 4): 1,44.5 1,4.75 36.875,4.75 36.875,44.5
GND on Bottom Layer "NONET_L-01_P-001" (solid, remove dead copper, pour order 10): 144,121 144,50.625 1,50.625 1,121
GND_KY2 on Bottom Layer "NONET_L-01_P-001" (solid, remove dead copper, pour order 8): 43.125,44.5 43.125,1 79.625,1 79.625,44.5
VSS_PCA_KY on Bottom Layer "NONET_L-01_P-001" (solid, remove dead copper, pour order 5): 1,44.5 1,4.75 36.875,4.75 36.875,44.5